# Altium PCB RF-IR-Blaster-v1.0.PcbDoc (part 2 of 2)
Units mm, origin at the board's own origin, x right, y up, seen from the top; angles counter-clockwise.
Board outline 65 x 61 mm, 2 copper layers (Top Layer, Bottom Layer), stack 1.58 mm thick; 64 components, 33 nets, 844 pads, 139 vias.
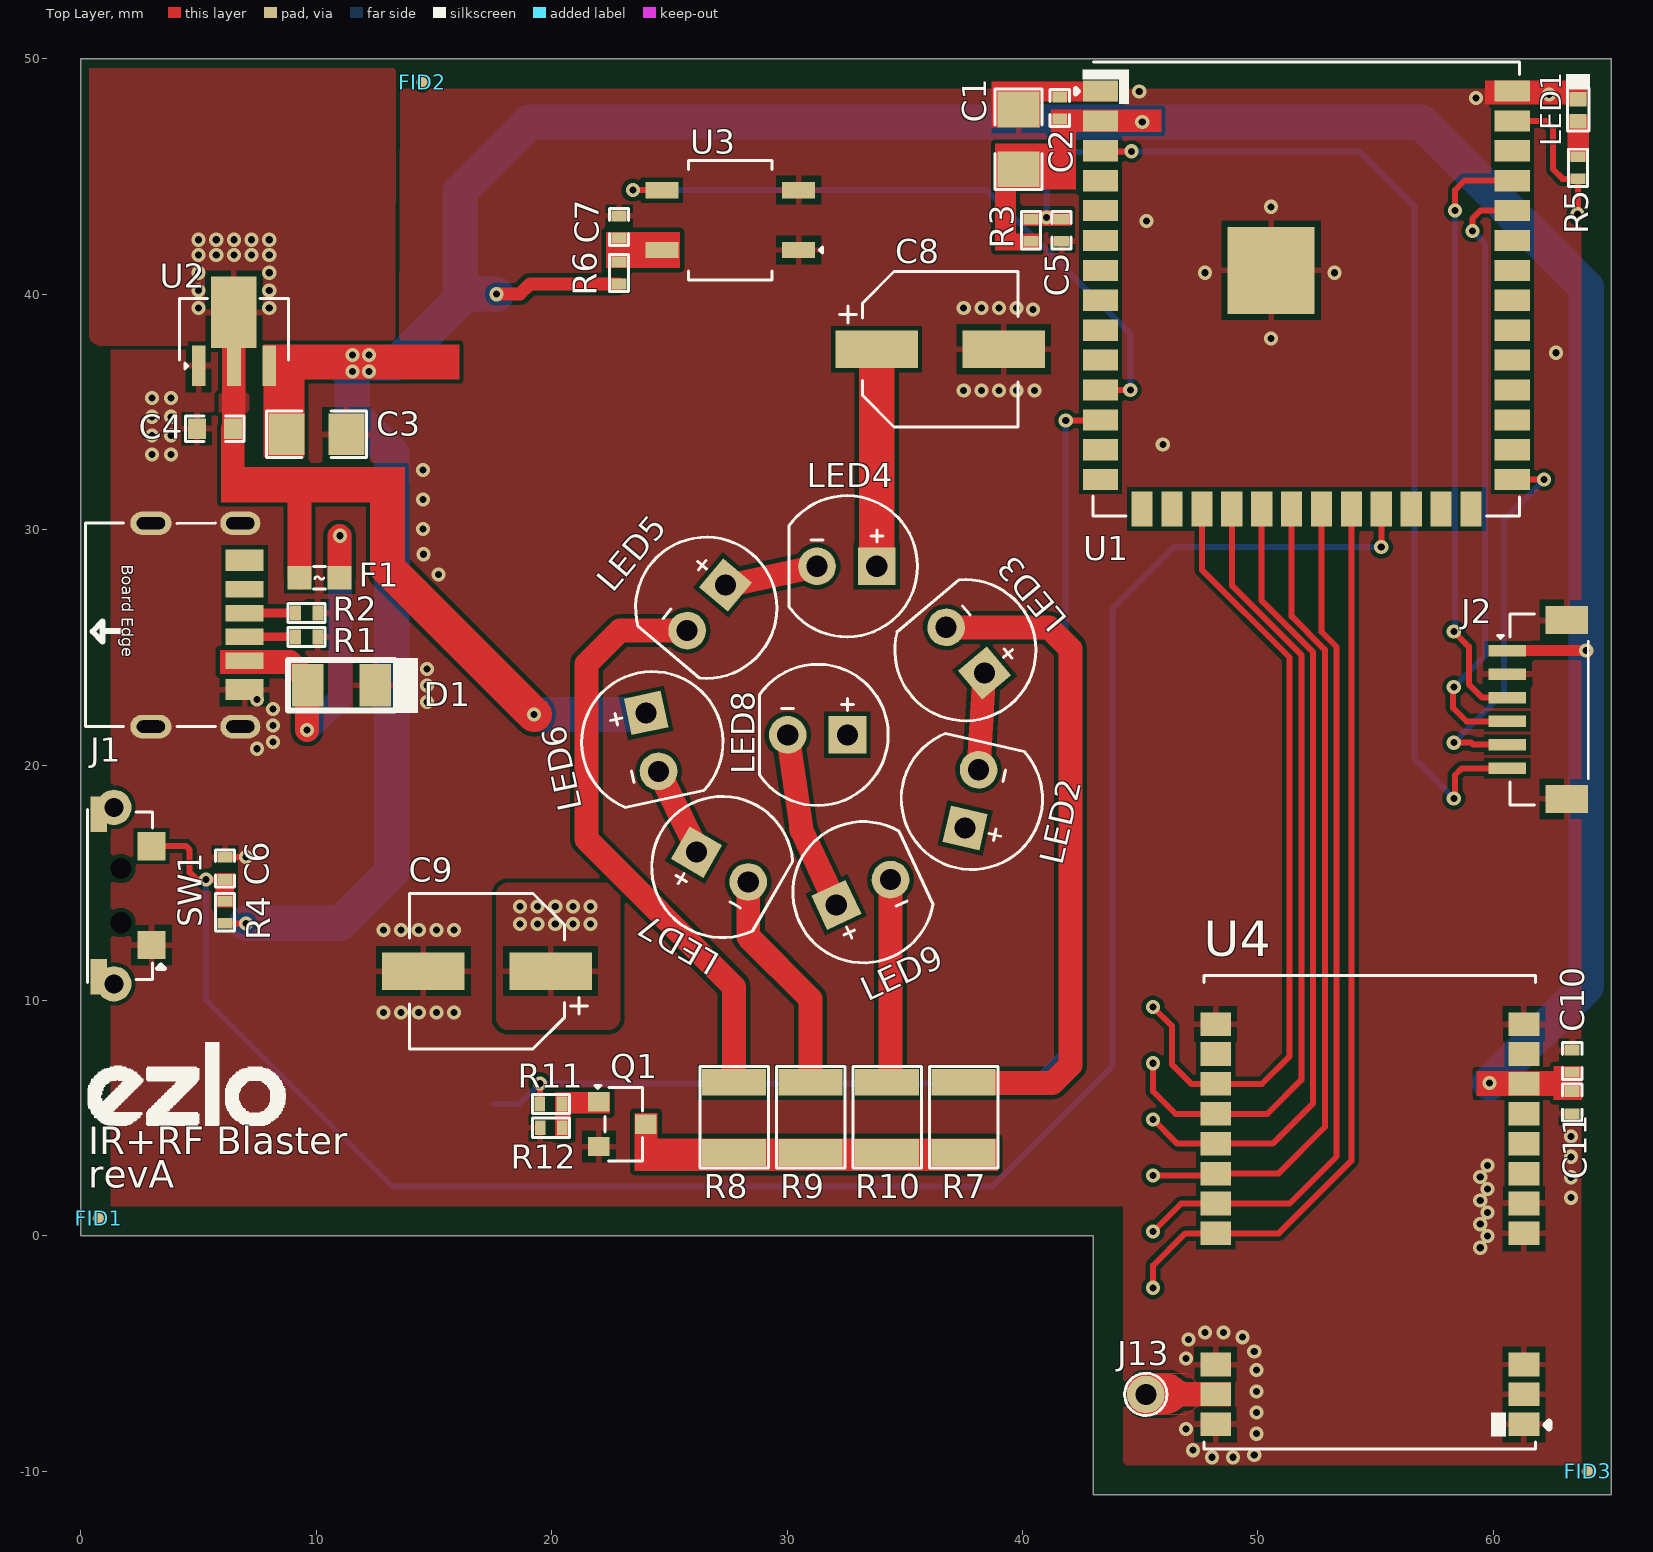
[diagram p0: Top Layer view]

## Via types
v1: diameter 0.6, hole 0.3, Top Layer to Bottom Layer, tented both sides, 138 vias
v2: diameter 0.6, hole 0.3, Top Layer to Bottom Layer, 1 vias

## Nets (pads, with @x,y where several pads share a name; then routed paths per layer and width w, separated by ;. In a path a pad name is that pad's centre, name@x,y a point inside that pad or via, vN(x,y) a via of type N, cw(c..) or ccw(c..) an arc to the next point about the centre after c; other vN are vias at no path point) (continued)
IO0: J2.5 P5.1 U1.27 | length 16.4
  Top Layer w0.254: v1(58.319,20.953) 59.057,20.953 59.127,20.884 60.574,20.884 J2.5 ; U1.27 60.811,32.131 v1(62.154,32.131)
  Bottom Layer w0.254: v1(58.319,20.953) 60.444,23.079 60.444,30.421 v1(62.154,32.131)
NetC7_2: C7.2 R6.1 U3.4
NetJ13_1: J13.1 U4.21
NetLED1_1: LED1.1 R5.1
NetLED2_2: LED2.2 LED3.1 | length 4.1
  Top Layer w1.016: LED2.2 38.351,23.498 LED3.1
NetLED3_2: LED3.2 R7.1 | length 28.2
  Top Layer w1.016: LED3.2 41.124,25.855 42.037,24.943 42.037,7.264 41.263,6.49 R7.1@37.5,6.49
NetLED4_2: LED4.2 LED5.1 | length 4
  Top Layer w1.016: LED5.1 27.793,27.695 LED4.2
NetLED5_2: LED5.2 R8.1 | length 25.2
  Top Layer w1.016: LED5.2 22.894,25.713 21.477,24.297 21.477,16.851 27.75,10.579 R8.1
NetLED6_2: LED6.2 LED7.1 | length 3.8
  Top Layer w1.016: LED6.2 26.04,16.704 LED7.1
NetLED7_2: LED7.2 R9.1 | length 9.6
  Top Layer w1.016: LED7.2 28.347,12.711 31,10.058 R9.1
NetLED8_2: LED8.2 LED9.1 | length 7.6
  Top Layer w1.016: LED8.2 30.594,17.373 30.616,17.226 31.966,14.33 LED9.1
NetLED9_2: LED9.2 R10.1 | length 8.7
  Top Layer w1.016: R10.1 34.33,6.528 34.392,6.59 LED9.2
NetQ1_1: Q1.1 R11.1 R12.2
NetQ1_3: Q1.3 R7.2 R8.2 R9.2 R10.2
RXD: J2.4 P6.1 U1.36 | length 25.9
  Top Layer w0.254: v1(58.319,23.315) 58.284,23.281 58.284,22.437 58.857,21.864 J2.4 ; v1(59.106,42.697) 59.106,43.213 59.45,43.557 U1.36
  Bottom Layer w0.254: v1(58.319,23.315) 59.639,24.636 59.639,42.164 v1(59.106,42.697)
TXD: J2.3 P7.1 U1.37 | length 25.8
  Top Layer w0.254: v1(58.319,25.678) 58.959,25.037 58.959,23.438 59.534,22.864 J2.3 ; v1(58.369,43.561) 58.369,44.425 58.772,44.827 U1.37
  Bottom Layer w0.254: v1(58.319,25.678) 58.369,25.728 v1(58.369,43.561)
VBUS: D1.2 F1.1 J1.A9 P2.1 | length 15.5
  Top Layer w1.016: J1.A9@7.244,24.386 8.872,24.386 9.637,23.622 D1.2 9.601,23.356 v1(9.601,21.488) ; F1.1 v1@10.985,29.73
  Bottom Layer w1.016: v1(9.601,21.488) 9.652,21.488 10.998,22.835 v1(10.998,29.743)
pads on no net: FID1.Un1 FID2.Un1 FID3.Un1 J1.B9 J1.B12 SW1.3 SW1.4 SW1.5 SW1.6 SW1.MH0 SW1.MH1 U1.4 U1.5 U1.6 U1.7 U1.8 U1.9 U1.10 U1.13 U1.14 U1.15 U1.16 U1.24 U1.25 U1.26 U1.28 U1.29 U1.30 U1.31 U1.32 U1.33 U1.34 U1.35 U1.38 U4.6 U4.7 U4.8 U4.10 U4.13

## Polygon pours and split planes (outlines as drawn)
GND on Top Layer "GND_L01_P012" (solid, remove dead copper, pour order 12): 1.27,1.27 44.196,1.27 44.27,1.27 44.27,-9.73 44.272,-9.73 63.73,-9.73 63.73,48.73 1.27,48.73 1.27,48.692
no net on Top Layer "F.Cu-/CC1101/ANT_FEED" (solid, remove dead copper, pour order 1): 48.827,-6.751 ccw(c48.377,-6.751) 48.377,-6.301 47.609,-6.301 cw(c47.609,-5.983) 47.384,-6.208 47.12,-5.944 ccw(c46.895,-6.169) 46.895,-5.851 45.221,-5.851 ccw(c45.221,-6.198) 45.046,-5.898 44.699,-6.1 ccw(c44.874,-6.4) 44.527,-6.4 44.527,-7.024 ccw(c44.858,-7.024) 44.674,-7.299 44.994,-7.513 ccw(c45.178,-7.238) 45.178,-7.569 46.875,-7.569 ccw(c46.875,-7.259) 47.059,-7.509 47.395,-7.261 cw(c47.579,-7.511) 47.579,-7.201 48.377,-7.201 ccw(c48.377,-6.751)
+5V on Top Layer "F.Cu-+5V-1" (solid, remove dead copper, pour order 10): 18.15,15 ccw(c18.15,14.5) 17.65,14.5 17.65,9.25 ccw(c18.15,9.25) 18.15,8.75 22.4,8.75 ccw(c22.4,9.25) 22.9,9.25 22.9,14.5 ccw(c22.4,14.5) 22.4,15
+5V on Top Layer "F.Cu-+5V" (solid, remove dead copper, pour order 3): 7.15,34.818 cw(c6.65,34.817) 6.65,34.318 6.35,34.318 cw(c6.35,34.817) 5.85,34.818 5.85,37.318 ccw(c5.35,37.318) 5.35,37.818 0.85,37.818 cw(c0.85,38.317) 0.35,38.318 0.35,49.603 13.385,49.603 13.351,38.316 cw(c12.852,38.317) 12.852,37.817 7.65,37.817 ccw(c7.65,37.318) 7.15,37.318
GND on Bottom Layer "GND_L02_P011" (solid, remove dead copper, pour order 11): 1.27,1.27 44.196,1.27 44.27,1.27 44.27,-9.73 44.272,-9.73 63.73,-9.73 63.73,48.73 1.27,48.73 1.27,48.692
+5V on Bottom Layer "B.Cu-+5V-3" (solid, remove dead copper, pour order 9): 17.9,13 ccw(c18.4,13) 18.4,12.5 23.216,12.5 ccw(c23.216,14.5) 23.216,16.5 18.4,16.5 ccw(c18.4,16) 17.9,16
no net on Bottom Layer "B.Cu-+5V-1" (solid, remove dead copper, pour order 7): 35.603,30.558 cw(c35.603,30.058) 35.957,30.412 40.664,25.705 cw(c40.31,25.351) 40.81,25.351 40.81,17.015 cw(c40.31,17.015) 40.664,16.662 35.957,11.955 cw(c35.603,12.308) 35.603,11.808 26.517,11.808 cw(c26.517,12.308) 26.164,11.955 21.957,16.162 cw(c22.31,16.515) 21.81,16.515 21.81,25.101 cw(c22.31,25.101) 21.957,25.455 26.914,30.412 cw(c27.267,30.058) 27.267,30.558
+5V on Bottom Layer "B.Cu-+5V-1" (solid, remove dead copper, pour order 5): 35.603,30.558 cw(c35.603,30.058) 35.957,30.412 40.664,25.705 cw(c40.31,25.351) 40.81,25.351 40.81,17.015 cw(c40.31,17.015) 40.664,16.662 35.957,11.955 cw(c35.603,12.308) 35.603,11.808 26.517,11.808 cw(c26.517,12.308) 26.164,11.955 21.957,16.162 cw(c22.31,16.515) 21.81,16.515 21.81,25.101 cw(c22.31,25.101) 21.957,25.455 26.914,30.412 cw(c27.267,30.058) 27.267,30.558
+5V on Bottom Layer "B.Cu-+5V-2" (solid, remove dead copper, pour order 2): 13.35,38.318 cw(c12.85,38.317) 12.85,37.818 0.85,37.818 cw(c0.85,38.317) 0.35,38.318 0.35,49.65 13.35,49.555

## Other copper
Top Layer:
  rectangle net +5V: 5.952,31.166 13.767,32.664
  rectangle net GND: 59.639,48.057 63.983,49.073
  rectangle net GND: 38.684,47.092 40.742,49.047
  rectangle net GND: 38.684,48.184 44.018,49.047
  rectangle net NetLED1_1: 63.144,45.669 64.059,47.6
  rectangle net +3V3: 7.747,36.373 16.078,37.871
  rectangle net +3V3: 41.504,46.888 45.898,47.854
  rectangle net +3V3: 41.215,44.45 42.266,47.854
  rectangle net +3V3: 38.837,44.45 42.266,46.406
  rectangle net +3V3: 38.837,41.859 39.726,46.406
  rectangle net +3V3: 38.837,41.859 40.727,42.584
  rectangle net EN: 40.03,42.901 42.063,43.586
  rectangle net +3V3: 59.284,5.942 62.941,7.01
  rectangle net +3V3: 62.56,5.766 63.754,7.214
  rectangle net NetC7_2: 22.301,41.123 25.451,42.647
  rectangle net +3V3: 7.747,33.096 9.5,37.871
  rectangle net GPIO21: 5.715,13.945 6.502,15.418
  rectangle net NetQ1_1: 20.142,4.14 20.828,6.121
  rectangle net NetQ1_1: 20.142,5.207 22.479,6.121
  rectangle net NetQ1_3: 23.52,2.769 24.486,5.232
  rectangle net NetQ1_3: 23.597,2.769 38.952,4.151
  rectangle net VBUS: 5.918,23.876 8.103,24.892
  region net NetJ13_1: 44.539,-6.262 ccw(c45.303,-6.688) 44.58,-7.18 ccw(c45.194,-6.891) 45.227,-7.569 46.052,-7.569 ccw(c46.052,-6.529) 46.787,-7.264 cw(c46.862,-7.34) 46.862,-7.233 48.797,-7.233 ccw(c48.797,-7.167) 48.844,-7.214 48.844,-6.223 47.11,-6.223 cw(c47.11,-5.562) 46.642,-6.029 ccw(c46.241,-6.431) 46.241,-5.863 45.13,-5.863 ccw(c45.13,-6.328) 44.801,-5.999
Bottom Layer:
  rectangle net +3V3: 10.693,36.339 12.04,37.834

## Silkscreen, mask and mechanical layers (free items; w line width, h text height)
Top Overlay:
  drawing of 4 lines, arcs and shapes, not listed
  text "IR+RF Blaster" at 0.305,3.099 h2
  text "revA" at 0.305,1.676 h2
Bottom Overlay:
  text "GPIO18" at 22.453,43.95 h1
  text "GPIO1" at 62.562,42.934 h1
  text "3V3" at 18.667,39.53 h1
  text "5V" at 11.24,39.492 h1
  text "GND" at 19.034,36.94 h1
  text "VBUS" at 14.453,29.243 h1
  text "TXD" at 57.335,25.18 h1
  text "RXD" at 57.335,22.818 h1
  text "IO0" at 57.306,20.43 h1
  text "EN" at 57.318,18.045 h1
  text "GD02" at 49.851,9.2 h1
  text "GD00" at 49.851,6.815 h1
  text "GPIO8" at 16.515,5.139 h1
  text "GPIO11" at 49.851,4.43 h1
  text "GPIO12" at 49.851,2.071 h1
  text "GPIO21" at 16.532,1.634 h1
  text "GPIO13" at 49.851,-0.339 h1
  text "CS" at 49.835,-2.71 h1
Dimension:
  drawing of 11071 lines, arcs and shapes, not listed
Board_Outline:
  the board outline again, w0.254
Fabrication:
  drawing of 1517 lines, arcs and shapes, not listed
  text "Layer" at 73.339,44.374 h1.52
  text "Name" at 83.75,44.374 h1.52
  text "Material" at 107.366,44.374 h1.52
  text "Thickness" at 129.204,44.374 h1.52
  text "Constant" at 145.71,44.374 h1.52
  text "Board Layer Stack" at 160.184,44.374 h1.52
  text "Top Overlay" at 83.75,41.326 h1.52
  text "Top Solder" at 83.75,38.278 h1.52
  text "Solder Resist" at 107.366,38.278 h1.52
  text "0.39mil" at 129.204,38.278 h1.52
  text "3.3" at 145.71,38.278 h1.52
  text "1" at 73.339,35.23 h1.52
  text "Top Layer" at 83.75,35.23 h1.52
  text "1.38mil" at 129.204,35.23 h1.52
  text "Dielectric 1" at 83.75,32.182 h1.52
  text "FR-4" at 107.366,32.182 h1.52
  text "59.45mil" at 129.204,32.182 h1.52
  text "4.5" at 145.71,32.182 h1.52
  text "2" at 73.339,29.134 h1.52
  text "Bottom Layer" at 83.75,29.134 h1.52
  text "1.38mil" at 129.204,29.134 h1.52
  text "Bottom Solder" at 83.75,26.086 h1.52
  text "Solder Resist" at 107.366,26.086 h1.52
  text "0.39mil" at 129.204,26.086 h1.52
  text "3.3" at 145.71,26.086 h1.52
  text "Bottom Overlay" at 83.75,23.038 h1.52
  text "Total board thickness:" at 73.339,19.99 h1.52
  text "62.99mil" at 129.204,19.99 h1.52
Mechanical 4:
  text "C2" at -140.543,-44.546 h0.04 r90
  text "JLCJLCJLCJLC" at -140.198,-44.572 h0.04
  text "C3" at -140.386,-44.634 h0.04 r90
  text "C5" at -141.18,-44.743 h0.04 r90
  text "R1" at -140.491,-44.752 h0.04 r90
  text "R2" at -139.529,-44.76 h0.04 r90
  text "R4" at -141.181,-44.82 h0.04 r90
  text "U2" at -140.813,-44.798 h0.04
  text "C1" at -140.396,-44.823 h0.04 r90
  text "U3" at -141.03,-44.907 h0.04
  text "U4" at -141.7,-44.936 h0.04
  text "C7" at -140.893,-44.956 h0.04
  text "C8" at -141.875,-45.128 h0.04
  text "D2" at -140.813,-45.144 h0.04
  text "J2" at -142.029,-45.163 h0.04
  text "C9" at -141.66,-45.163 h0.04
  text "D5" at -141.135,-45.287 h0.04 r51.43
  text "U1" at -140.017,-45.31 h0.04
  text "F1" at -141.588,-45.33 h0.04
  text "D6" at -140.416,-45.332 h0.04 r128.57
  text "R12" at -141.634,-45.379 h0.04
  text "R11" at -141.625,-45.428 h0.04
  text "D9" at -140.861,-45.42 h0.04
  text "D10" at -141.506,-45.507 h0.04
  text "D8" at -141.225,-45.628 h0.04 r102.86
  text "J1" at -139.52,-45.712 h0.04 r180
  text "D3" at -140.4,-45.737 h0.04 r77.14
  text "C6" at -141.522,-45.812 h0.04
  text "C4" at -141.734,-45.816 h0.04 r90
  text "SW1" at -141.84,-45.867 h0.04 r90
  text "R3" at -141.734,-45.902 h0.04 r90
  text "D4" at -141.014,-45.911 h0.04 r154.28
  text "U5" at -139.937,-45.96 h0.04
  text "D7" at -140.706,-46 h0.04 r25.71
  text "C11" at -139.529,-46.048 h0.04 r90
  text "R9" at -141.313,-46.157 h0.04
  text "Q1" at -141.18,-46.143 h0.04
  text "R10" at -141.338,-46.285 h0.04
  text "IR+RF Blaster" at -142.027,-46.33 h0.06
  text "C10" at -139.529,-46.322 h0.04 r90
  text "revA" at -142.017,-46.354 h0.04
  text "R7" at -140.999,-46.354 h0.04
  text "R8" at -140.871,-46.354 h0.04
  text "R6" at -140.742,-46.354 h0.04
  text "R5" at -140.615,-46.354 h0.04
  text "1223" at -141.854,-46.383 h0.04
  text "AE1" at -140.339,-46.816 h0.04
Mechanical 7:
  lines w0.013: -142.016,-44.871 -142.016,-44.468 -141.553,-44.468 -141.553,-44.704 -141.632,-44.783 -141.632,-44.871 -141.701,-44.871 -141.701,-44.743 -141.898,-44.743 -141.898,-44.871 -142.016,-44.871
Mechanical 11:
  drawing of 228 lines, arcs and shapes, not listed

## Dimensions
65,50 to 65,-11 on Dimension
0,50 to 65,50 on Dimension

## Text inside footprints (layer, text, board x,y; h text height)
J1: Top Overlay "Board Edge" at 1.736,28.523 h0.5 r270